# Altium PCB PCB1.PcbDoc (part 2 of 2)
Units mil, origin at the board's own origin, x right, y up, seen from the top; angles counter-clockwise.
Board outline 6000 x 4000 mil, 2 copper layers (Top Layer, Bottom Layer); 136 components, 92 nets, 517 pads, 0 vias.
Unrouted connection lines stored in the file: 335.
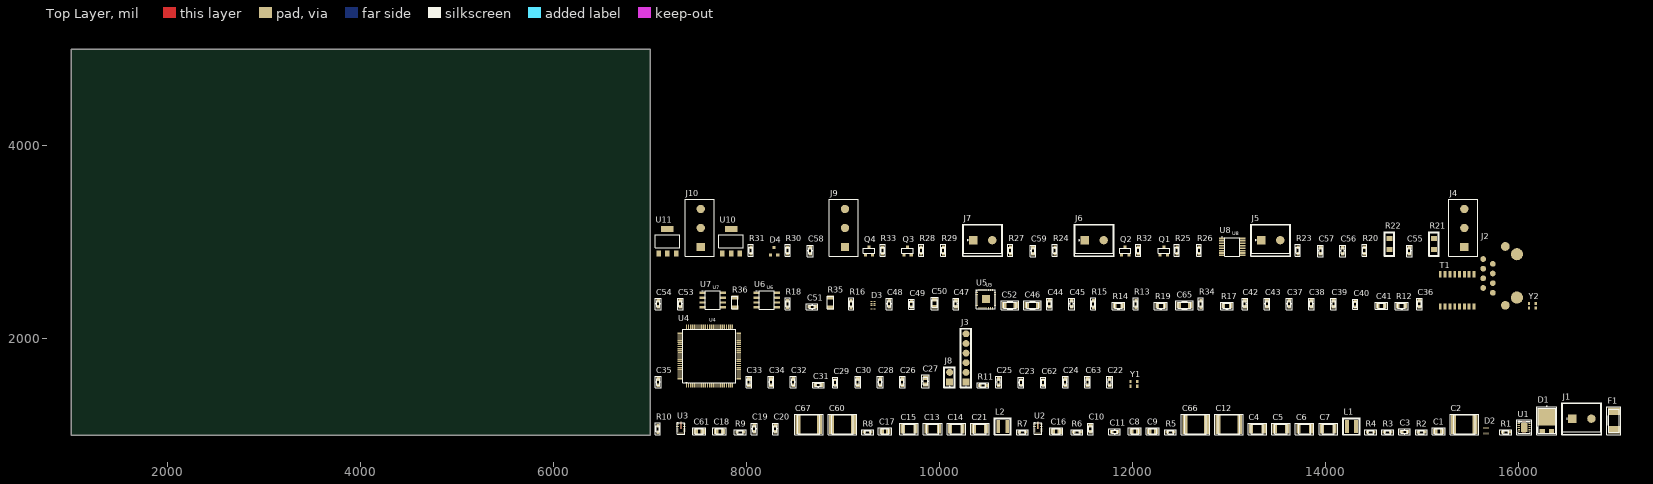
[diagram p0: Top Layer view]

## Part data (continued)
R11 R16 R18 R24 R30: library part GW_FRC0603J103TS_7289f91d, "FRC0603J103TS; 10 kOhm; >= 3.3 V; tension de trabajo por verificar; CAD_CANDIDATE", Manufacturer=FOJAN, Manufacturer Part Number=FRC0603J103TS, Package=0603, Power Rating="0.1 W", Rating=">= 3.3 V; tension de trabajo por verificar", Tolerance=5%, CAD_Limitations="Glyph pins/types inspected; exact manufacturer land-pattern/mask/paste qualification pending.", CAD_Source="Professor_shared.SchLib glyph Res_10k_0603_1/10W", CAD_Status=CAD_CANDIDATE, Electrical_Notes="Ratings transcritos del CAD; falta ficha FOJAN. Alternativa RC0603FR-0710KL con ficha oficial local, mismo footprint candidato. Modelo candidato existente; sin cotejo visual de pads/pines en Altium.", Electrical_Status=PROVISIONAL
R12 R14 R17 R19: "75Ohm1%0.125W0805 Vishay D/CRCW e3; Ethernet cable termination; not C-suffix commodity variant", LCSC Part Number=C844859, Manufacturer=Vishay, Package="0805 /2012", Power Rating="0.125 W at70C, derating applies", Tolerance=1%, Assembly="JLC Extended observed, quantity unknown, verify before ordering", CAD Status=CAD_VERIFIED, Datasheet=https://www.vishay.com/docs/20035/dcrcwe3.pdf, Design Approval=RETAINED_ORIGINAL_SELECTION, Electrical Test=NOT_TESTED, Local Datasheet=sources/ethernet_75ohm/C844859.pdf, Manufacturer Part Number=CRCW080575R0FKEA, Source="Vishay20035 Rev18-Jun-2018 p3 ordering, p9 body/reflow lands, JLC C844859 exact identity observed2026-11-07", TCR="100 ppm/K", Terminal Mapping="Nonpolar resistor: project pin1=left pad1,pin2=right pad2"
R13: library part GW_RC0603FR-076K49L_f42a9329, "RC0603FR-076K49L; 6.49 kOhm; 75 V max; limite sqrt(P*R); CAD_CANDIDATE", Manufacturer=Yageo, Manufacturer Part Number=RC0603FR-076K49L, Package=0603, Power Rating="0.1 W @70 C", Rating="75 V max; limite sqrt(P*R)", Tolerance=1%, CAD_Limitations="Glyph pins/types inspected; exact manufacturer land-pattern/mask/paste qualification pending.", CAD_Source="Professor_shared.SchLib glyph Res_10k_0603_1/10W", CAD_Status=CAD_CANDIDATE, Electrical_Notes="P<3.3^2/6490=1.68 mW; actualizacion de valor/MPN sobre simbolo generico pendiente. Modelo candidato existente; sin cotejo visual de pads/pines en Altium.", Electrical_Status=PROVISIONAL
R15 R27 R31: library part GW_RC0603FR-072K49L_b905c5f0, "RC0603FR-072K49L; 2.49 kOhm; 75 V max; limite sqrt(P*R); CAD_CANDIDATE", Manufacturer=Yageo, Manufacturer Part Number=RC0603FR-072K49L, Package=0603, Power Rating="0.1 W @70 C", Rating="75 V max; limite sqrt(P*R)", Tolerance=1%, CAD_Source="Professor_shared.SchLib glyph Res_10k_0603_1/10W", Electrical_Notes="Candidato ENHANCED/RMII leader: ModeSelect NC, strap1=1 default, strap8=1, strap5=0 default. Ver tabla del informe; sin LEDs de straps. Modelo candidato existente; sin cotejo visual de pads/pines en Altium.", Electrical_Status=PROVISIONAL
  R15: CAD_Limitations="Glyph pins/types inspected; exact manufacturer land-pattern/mask/paste qualification pending.", CAD_Status=CAD_CANDIDATE
  R27 R31: CAD_Limitations="Same-manufacturer series mounting geometry verified; prototype mask/paste choices recorded. Electrical application limits unchanged. Native instance links/ECO pending.", CAD_Status=CAD_VERIFIED_SOURCE_LAND;NATIVE_INSTANCE_ECO_PENDING
R20 R23: library part GW_RC0603FR-07562RL_a6fad8df, "RC0603FR-07562RL; 562 Ohm; 75 V max; limite sqrt(P*R); CAD_CANDIDATE", Manufacturer=Yageo, Manufacturer Part Number=RC0603FR-07562RL, Package=0603, Power Rating="0.1 W @70 C", Rating="75 V max; limite sqrt(P*R)", Tolerance=1%, CAD_Limitations="Glyph pins/types inspected; exact manufacturer land-pattern/mask/paste qualification pending.", CAD_Source="Professor_shared.SchLib glyph Res_10k_0603_1/10W", CAD_Status=CAD_CANDIDATE, Electrical_Notes="Ityp2.25mA; P conservadora a2.75mA=4.30mW. No es resistor de24V completos; corriente de campo separada deVCC1. Modelo candidato existente; sin cotejo visual de pads/pines en Altium.", Electrical_Status=PROVISIONAL
R21 R22: "MM204F1K00TKRTR3K0; CAD_VERIFIED_GEOMETRY; Saved1.3x1.6landsatx+/-1.45mmmatchmanufacturerreflowtable. Nonpolar1/2projectmappingverified. NormalDIType3applicationonly;no500V/1kVsurgequalificationinferredfromMELFor0.25W. NativeDIresistornetsmustbecorrected.", Manufacturer=Firstohm, CAD Status=CAD_CANDIDATE, Limitations="1kOhm1%,0.25W@70C, normal Type3 operation supported. 500V/1kV system surge withstand NOT established.", Manufacturer Part Number=MM204F1K00TKRTR3K0, Source="Firstohm MM rev08-March-2023 printedpp75-78, p78 reflow pad table MM16/MM204"
R25 R28: "RC0603FR-07100RL;1%0.1W75V0603; manufacturer RCseries ordering;Yageo mounting13Feb2018V10p4", Manufacturer=Yageo, Package=0603, Power Rating="0.1W at70C", Tolerance=1%, Voltage Rating="75V or sqrt(P*R),whichever lower", CAD Status=CAD_VERIFIED_GEOMETRY;NATIVE_PLACEMENT_PENDING, Electrical Status=DERIVED_PENDING_REVIEW;ORDER_CODE_FAMILY_SUPPORTED;EXACT_NOMINAL_SHEET_PENDING, Manufacturer Part Number=RC0603FR-07100RL, Source="Yageo RC0603 series order coding; Mounting13Feb2018V10 p4 Fig4/Table1"
R26 R29 R32 R33: "RC0603FR-074K7L;1%0.1W75V0603; manufacturer RCseries ordering;Yageo mounting13Feb2018V10p4", Manufacturer=Yageo, Package=0603, Power Rating="0.1W at70C", Tolerance=1%, Voltage Rating="75V or sqrt(P*R),whichever lower", CAD Status=CAD_VERIFIED_GEOMETRY;NATIVE_PLACEMENT_PENDING, Electrical Status=DERIVED_PENDING_REVIEW;ORDER_CODE_FAMILY_SUPPORTED;EXACT_NOMINAL_SHEET_PENDING, Manufacturer Part Number=RC0603FR-074K7L, Source="Yageo RC0603 series order coding; Mounting13Feb2018V10 p4 Fig4/Table1"
R34: library part RC0603FR-0710KL, "Existing exact Yageo RC0603FR-0710KL sheet p1; AN5419 boot example; TI SLLSF78B section10.1; 10kOhm1%0.1W@70C; replaces unqualified FOJAN identity. Shared professor lands remain CAD_CANDIDATE, not qualified manufacturer lands.", Manufacturer=Yageo, CAD Status=CAD_VERIFIED_SOURCE_LAND;NATIVE_INSTANCE_ECO_PENDING, Limitations="Same-manufacturer series mounting geometry verified; prototype mask/paste choices recorded. Electrical application limits unchanged. Native instance links/ECO pending.", Manufacturer Part Number=RC0603FR-071ML, Source="Yageo RC_L product specification V.11 (2020), Table 2 p5"
R35 R36: "Vishay D/CRCW e3 family20035;120ohm1%0.25W1206; optional bus-end termination,open-default jumper.", Manufacturer=Vishay, Package=1206, Power Rating="0.25W at70C", Tolerance=1%, CAD Status=CAD_VERIFIED_GEOMETRY;NATIVE_PLACEMENT_PENDING, Datasheet=sources/ethernet_75ohm/C844859.pdf, Electrical Status=DERIVED_PENDING_REVIEW;END_NODE_ONLY;STOCK_UNVERIFIED, Manufacturer Part Number=CRCW1206120RFKEA, Source="Vishay20035 family ordering/power;18Jun2018p9 REFLOW1206 lands"
T1: "Pulse HX1188FNL revB 30-May-2014 sheets2-3 PS-2005.002-D; Use exact winding map; NC4,5,12,13 remain unconnected. FNLT is packaging variant; selected MPN FNL.", Manufacturer="Pulse Electronics", CAD Status=CAD_CANDIDATE, Limitations="Use exact winding map; NC4,5,12,13 remain unconnected. FNLT is packaging variant; selected MPN FNL.", Manufacturer Part Number=HX1188FNL, Source="Pulse HX1188FNL revB 30-May-2014 sheets2-3 PS-2005.002-D"
U1: "Single-channel60V eFuse; TPS26620 latch-off; RTN != system GND; DRC10+EP11", Manufacturer="Texas Instruments", CAD Status=CAD_CANDIDATE, Critical Connection="Pin5 and EP11 to EF_RTN, NEVER directly to system GND pin6", Datasheet=https://www.ti.com/lit/ds/symlink/tps2662.pdf, Design Approval=APPROVED_COMPONENT_SELECTION, Electrical Test=NOT_TESTED, Fault Response="TPS26620 latch-off, adjustable overvoltage cutoff, not TPS26621 auto-retry", Footprint Limitation="Native custom-pad11 extension conversion/net inheritance pending, not PCB-release ready", Local Datasheet=sources/tps26620/tps2662.pdf, Manufacturer Part Number=TPS26620DRCR, Source="TI TPS2662 SLVSDT4F Dec2021 Table6-1 p4, DRC0010J4218878/B board p44/stencil p45"
U2 U3: "LMR36015FBRNXR; CAD_CANDIDATE; CAD_CANDIDATE: confirm delivered RNX revision A/B. NC3 is externally connected to SW per TI. RNX12 is SW, not a ground exposed pad. Two footprint variants retained.", Manufacturer="Texas Instruments", CAD_Limitations="CAD_CANDIDATE: confirm delivered RNX revision A/B. NC3 is externally connected to SW per TI. RNX12 is SW, not a ground exposed pad. Two footprint variants retained.", CAD_Source="SNVSB49D p4; RNX0012A 4222858/A PDF pp44-46 and RNX0012B 4223969/C pp47-49", CAD_Status=CAD_CANDIDATE, Electrical_Status=PROVISIONAL, Manufacturer Part Number=LMR36015FBRNXR
U4: "STM32H723VET6; CAD_CANDIDATE; GPIOs use bidirectional ERC type; oscillator pins have dedicated types. VCAP power pins are LDO outputs, never connect to VDD.", Manufacturer=STMicroelectronics, CAD_Limitations="GPIOs use bidirectional ERC type; oscillator pins have dedicated types. VCAP power pins are LDO outputs, never connect to VDD.", CAD_Source="DS13313 Rev5 fig5, table7 pp57-71, fig65 p218 (PDF p219)", CAD_Status=CAD_CANDIDATE, Electrical_Status=PROVISIONAL, Manufacturer Part Number=STM32H723VET6
U5: "DP83826IRHBR; CAD_CANDIDATE; Multi-function strap pins conservatively bidirectional. Mode not frozen. EP33 must be soldered to ground; thermal vias are board-level optional, filled/plugged/tented if under paste.", Manufacturer="Texas Instruments", CAD_Limitations="Multi-function strap pins conservatively bidirectional. Mode not frozen. EP33 must be soldered to ground; thermal vias are board-level optional, filled/plugged/tented if under paste.", CAD_Source="SNLS647I table5-1 pp5-6; exposed pad p7; RHB0032M 4223725/A PDF pp111-113", CAD_Status=CAD_CANDIDATE, Electrical_Status=PROVISIONAL, Manufacturer Part Number=DP83826IRHBR
U6: "THVD1420DR; CAD_CANDIDATE;", Manufacturer="Texas Instruments", CAD_Limitations="Circuit not electrically released.", CAD_Source="SLLSF78B table4-1 p3; D0008A 4214825/C PDF pp30-32", CAD_Status=CAD_CANDIDATE, Electrical_Status=PROVISIONAL, Manufacturer Part Number=THVD1420DR
U7: "ATA6561-GAQW; CAD_CANDIDATE;", Manufacturer=Microchip, CAD_Limitations="Circuit not electrically released.", CAD_Source="DS20005991B pin table p3; C04-2057-OA RevE p19", CAD_Status=CAD_CANDIDATE, Electrical_Status=PROVISIONAL, Manufacturer Part Number=ATA6561-GAQW
U8: "ISO1212DBQR; CAD_CANDIDATE; SUB12 and SUB13 must remain separate floating nets. TI recommends an individual 2x2mm floating copper island for each; these board-level islands are NOT encoded in this package footprint. Never join to either FGND, GND1 or each", Manufacturer="Texas Instruments", CAD_Limitations="SUB12 and SUB13 must remain separate floating nets. TI recommends an individual 2x2mm floating copper island for each; these board-level islands are NOT encoded in this package footprint. Never join to either FGND, GND1 or each other. NC6/7 unconnected.", CAD_Source="SLLSEY7G table4-2 p4; DBQ0016A 4214846/A PDF pp44-46", CAD_Status=CAD_CANDIDATE, Electrical_Status=PROVISIONAL, Manufacturer Part Number=ISO1212DBQR
U10 U11: "BSP75NTA smart low-side switch; physical terminal positions and Diodes land pattern verified; IN,D,S,S_TAB identifiers; driver VOH acceptance remains pending.", Manufacturer="Diodes Incorporated", CAD Status=CAD_VERIFIED, CAD_Limitations="CAD_BLOCKED: terminal identifiers are role names, not manufacturer numbers. Tab=Source, isolated from Drain. Need exact numbered Type DN drawing/model before any placement or footprint binding.", CAD_Source="Diodes DS33016 Rev7-2 pp1,8; terminal numbering absent", CAD_Status=CAD_BLOCKED, Datasheet=sources/bsp75n_closure/BSP75N.pdf, Electrical Approval=ELECTRICAL_BLOCKED_DRIVER_VOLTAGE_PENDING, Electrical_Status=PROVISIONAL, Limitations="Physical mapping verified from Diodes top view: with tab above, left IN, middle D, right S; tab S_TAB=Source. No manufacturer numeric pin IDs asserted. Loaded driver VOH and startup OFF not yet verified.", Manufacturer Part Number=BSP75NTA, Physical Mapping="IN left lower;D center lower;S right lower;S_TAB upper tab;Top View", Source="Diodes DS33016 Rev7-2 Jan2024 p1 Top View Pin Out, p8 Suggested Pad Layout; functional pad identifiers preserve original symbol pins"
Y1 Y2: "Kyocera TNY1T-H1-DEX01-11 17-Jul-2026 pp4,6 table2 fig4; Two independent oscillators proposed; 10nF per supply. Tie1 to3V3. Load<=15pF and PHY phase-noise qualification pending.", Manufacturer=Kyocera, CAD Status=CAD_CANDIDATE, Limitations="Two independent oscillators proposed; 10nF per supply. Tie1 to3V3. Load<=15pF and PHY phase-noise qualification pending.", Manufacturer Part Number=KC2016Z25.0000C15XXK, Source="Kyocera TNY1T-H1-DEX01-11 17-Jul-2026 pp4,6 table2 fig4"

## Nets (pads, with @x,y where several pads share a name; then routed paths per layer and width w, separated by ;. In a path a pad name is that pad's centre, name@x,y a point inside that pad or via, vN(x,y) a via of type N, cw(c..) or ccw(c..) an arc to the next point about the centre after c; other vN are vias at no path point)
3.3V: C4.1 C5.1 C6.1 C7.2 C11.1 C22.1 C23.1 C24.1 C25.2 C26.1 C27.1 C29.1 C30.1 C31.1 C32.1 C35.1 C36.2 C38.1 C39.1 C40.1 C41.1 C47.1 C48.1 C49.1 C50.1 C51.1 C54.1 C56.1 C62.1 C63.1 J3.6 J8.2 L1.2 R5.2 R15.1 R16.2 U4.6 U4.11 U4.20 U4.21 U4.27 U4.50 U4.75 U4.100 U5.3 U5.17 U6.8 U7.5 U8.2 U8.3 Y1.1 Y1.4 Y2.1 Y2.4
5V: C13.1 C14.1 C15.1 C20.1 C21.2 C53.1 C58.1 C59.1 L2.2 Q2.S Q4.S R8.2 R26.2 R29.2 U7.3
24V: C8.1 C9.1 C12.2 C17.2 C18.1 C60.2 C66.2 C67.2 R6.1 R9.1 U1.10 U2.2 U2.9 U2.10 U3.2 U3.9 U3.10
B3_SW: C10.1 L1.1 U2.3 U2.12
B5_SW: C19.1 L2.1 U3.3 U3.12
CHASSIS: C46.1 C52.1 C65.2 J2.S1 J2.S2 R34.2
DO1_DRAIN: J6.2 U10.D
DO1_DRIVE: Q2.D R27.1 U10.IN
DO1_GATE: Q2.G R25.2 R26.1
DO2_DRAIN: J7.2 U11.D
DO2_DRIVE: Q4.D R31.1 U11.IN
DO2_GATE: Q4.G R28.2 R29.1
DO_EXT_PLUS: J5.1 J6.1 J7.1
EF_RTN: C3.1 R2.2 R4.2 U1.5 U1.11
FIELD_COM: C55.2 C57.2 J4.3 U8.9 U8.14
GND: C1.1 C2.1 C4.2 C5.2 C6.2 C7.1 C8.2 C9.2 C12.1 C13.2 C14.2 C15.2 C16.1 C17.1 C18.2 C21.1 C22.2 C23.2 C24.2 C25.1 C26.2 C27.2 C28.2 C29.2 C30.2 C31.2 C32.2 C33.2 C34.2 C35.2 C36.1 C37.2 C38.2 C39.2 C40.2 C41.2 C42.2 C43.2 C44.2 C45.2 C47.2 C48.2 C49.2 C50.2 C51.2 C53.2 C54.2 C56.2 C58.2 C59.2 C60.1 C61.1 C62.2 C63.2 C65.1 C66.1 C67.1 D2.1 D2.2 D2.3 D3.3 D3.8 D4.3 J1.2 J3.2 J3.5 J5.2 J9.3 J10.3 Q1.E Q3.E R7.1 R10.1 R11.2 R13.1 R18.1 R24.1 R27.2 R30.1 R31.2 R34.1 U1.6 U2.1 U2.6 U2.11 U3.1 U3.6 U3.11 U4.10 U4.19 U4.26 U4.49 U4.74 U4.99 U5.33 U6.5 U7.2 U8.1 U8.8 U10.S U10.S_TAB U11.S U11.S_TAB Y1.2 Y2.2
MDI_RXN: D3.5 T1.8 U5.4
MDI_RXP: D3.4 T1.6 U5.5
MDI_TXN: D3.2 T1.3 U5.6
MDI_TXP: D3.1 T1.1 U5.7
NetC1_2: C1.2 C2.2 D1.K D2.4 D2.5 D2.6 R1.2 U1.1
NetC3_2: C3.2 U1.8
NetC10_2: C10.2 U2.4
NetC11_2: C11.2 R5.1 R7.2 U2.7
NetC16_2: C16.2 U2.5
NetC19_2: C19.2 U3.4
NetC20_2: C20.2 R8.1 R10.2 U3.7
NetC37_1: C37.1 U5.2
NetC42_1: C42.1 C43.1 T1.2
NetC44_1: C44.1 C45.1 T1.7
NetC46_2: C46.2 R12.2 R14.2
NetC52_2: C52.2 R17.2 R19.1
NetC61_2: C61.2 U3.5
NetD1_1: D1.1 D1.2 F1.2
NetD4_1: D4.1 J9.2 R35.2 U6.7
NetD4_2: D4.2 J9.1 R35.1 U6.6
NetF1_1: F1.1 J1.1
NetJ2_4: J2.4 J2.5 R19.2
NetJ2_7: J2.7 J2.8 R17.1
NetJ4_1: J4.1 R21.2
NetJ4_2: J4.2 R22.2
NetJ8_1: J8.1 R11.1 U4.94
NetJ10_1: J10.1 R36.2 U7.7
NetJ10_2: J10.2 R36.1 U7.6
NetQ1_B: Q1.B R32.2
NetQ1_C: Q1.C R25.1
NetQ3_B: Q3.B R33.2
NetQ3_C: Q3.C R28.1
NetR2_1: R2.1 U1.7
NetR6_2: R6.2 U2.8
NetR9_2: R9.2 U3.8
NetR12_1: R12.1 T1.10
NetR13_2: R13.2 U5.10
NetR14_1: R14.1 T1.15
NetR15_2: R15.2 U5.14
NetR16_1: R16.1 U4.58 U6.2
NetR18_2: R18.2 U4.57 U6.3
NetR20_1: R20.1 U8.15
NetR23_1: R23.1 U8.10
NetR24_2: R24.2 R32.1 U4.1
NetR30_2: R30.2 R33.1 U4.2
NetU4_3: U4.3 U8.4
NetU4_4: U4.4 U8.5
NetU4_5: U4.5 U5.32
NetU4_16: U4.16 U5.12
NetU4_23: U4.23 U5.19
NetU4_24: U4.24 U5.11
NetU4_31: U4.31 U5.18
NetU4_32: U4.32 U5.16
NetU4_33: U4.33 U5.15
NetU4_37: U4.37 U7.8
NetU4_47: U4.47 U5.23
NetU4_51: U4.51 U5.24
NetU4_52: U4.52 U5.25
NetU4_55: U4.55 U6.4
NetU4_56: U4.56 U6.1
NetU4_81: U4.81 U7.4
NetU4_82: U4.82 U7.1
NRST: C28.1 J3.4 U4.14
OVP: R3.1 R4.1 U1.3
PH0: U4.12 Y1.3
RX+: J2.3 T1.11
RX-: J2.6 T1.9
SENSE1: C55.1 R20.2 R21.1 U8.16
SENSE2: C57.1 R22.1 R23.2 U8.11
SWCLK: J3.3 U4.76
SWDIO: J3.1 U4.72
TX+: J2.1 T1.16
TX-: J2.2 T1.14
UVLO: R1.1 R3.2 U1.2
VCAP: C33.1 C34.1 U4.48 U4.73
XI: U5.9 Y2.3
pads on no net: D3.6 D3.7 D3.9 D3.10 J2.MP1 J2.MP2 T1.4 T1.5 T1.12 T1.13 U1.4 U1.9 U4.7 U4.8 U4.9 U4.13 U4.15 U4.17 U4.18 U4.22 U4.25 U4.28 U4.29 U4.30 U4.34 U4.35 U4.36 U4.38 U4.39 U4.40 U4.41 U4.42 U4.43 U4.44 U4.45 U4.46 U4.53 U4.54 U4.59 U4.60 U4.61 U4.62 U4.63 U4.64 U4.65 U4.66 U4.67 U4.68 U4.69 U4.70 U4.71 U4.77 U4.78 U4.79 U4.80 U4.83 U4.84 U4.85 U4.86 U4.87 U4.88 U4.89 U4.90 U4.91 U4.92 U4.93 U4.95 U4.96 U4.97 U4.98 U5.1 U5.8 U5.13 U5.20 U5.21 U5.22 U5.26 U5.27 U5.28 U5.29 U5.30 U5.31 U8.6 U8.7 U8.12 U8.13